# Altium PCB ePBR25_ACU_Latching_rev0.PcbDoc (part 1 of 3)
Units mil, origin at the board's own origin, x right, y up, seen from the top; angles counter-clockwise.
Board outline 2203 x 2390 mil, 2 copper layers (Top Layer, Bottom Layer); 131 components, 88 nets, 367 pads, 243 vias.
Unrouted connection lines stored in the file: 94.
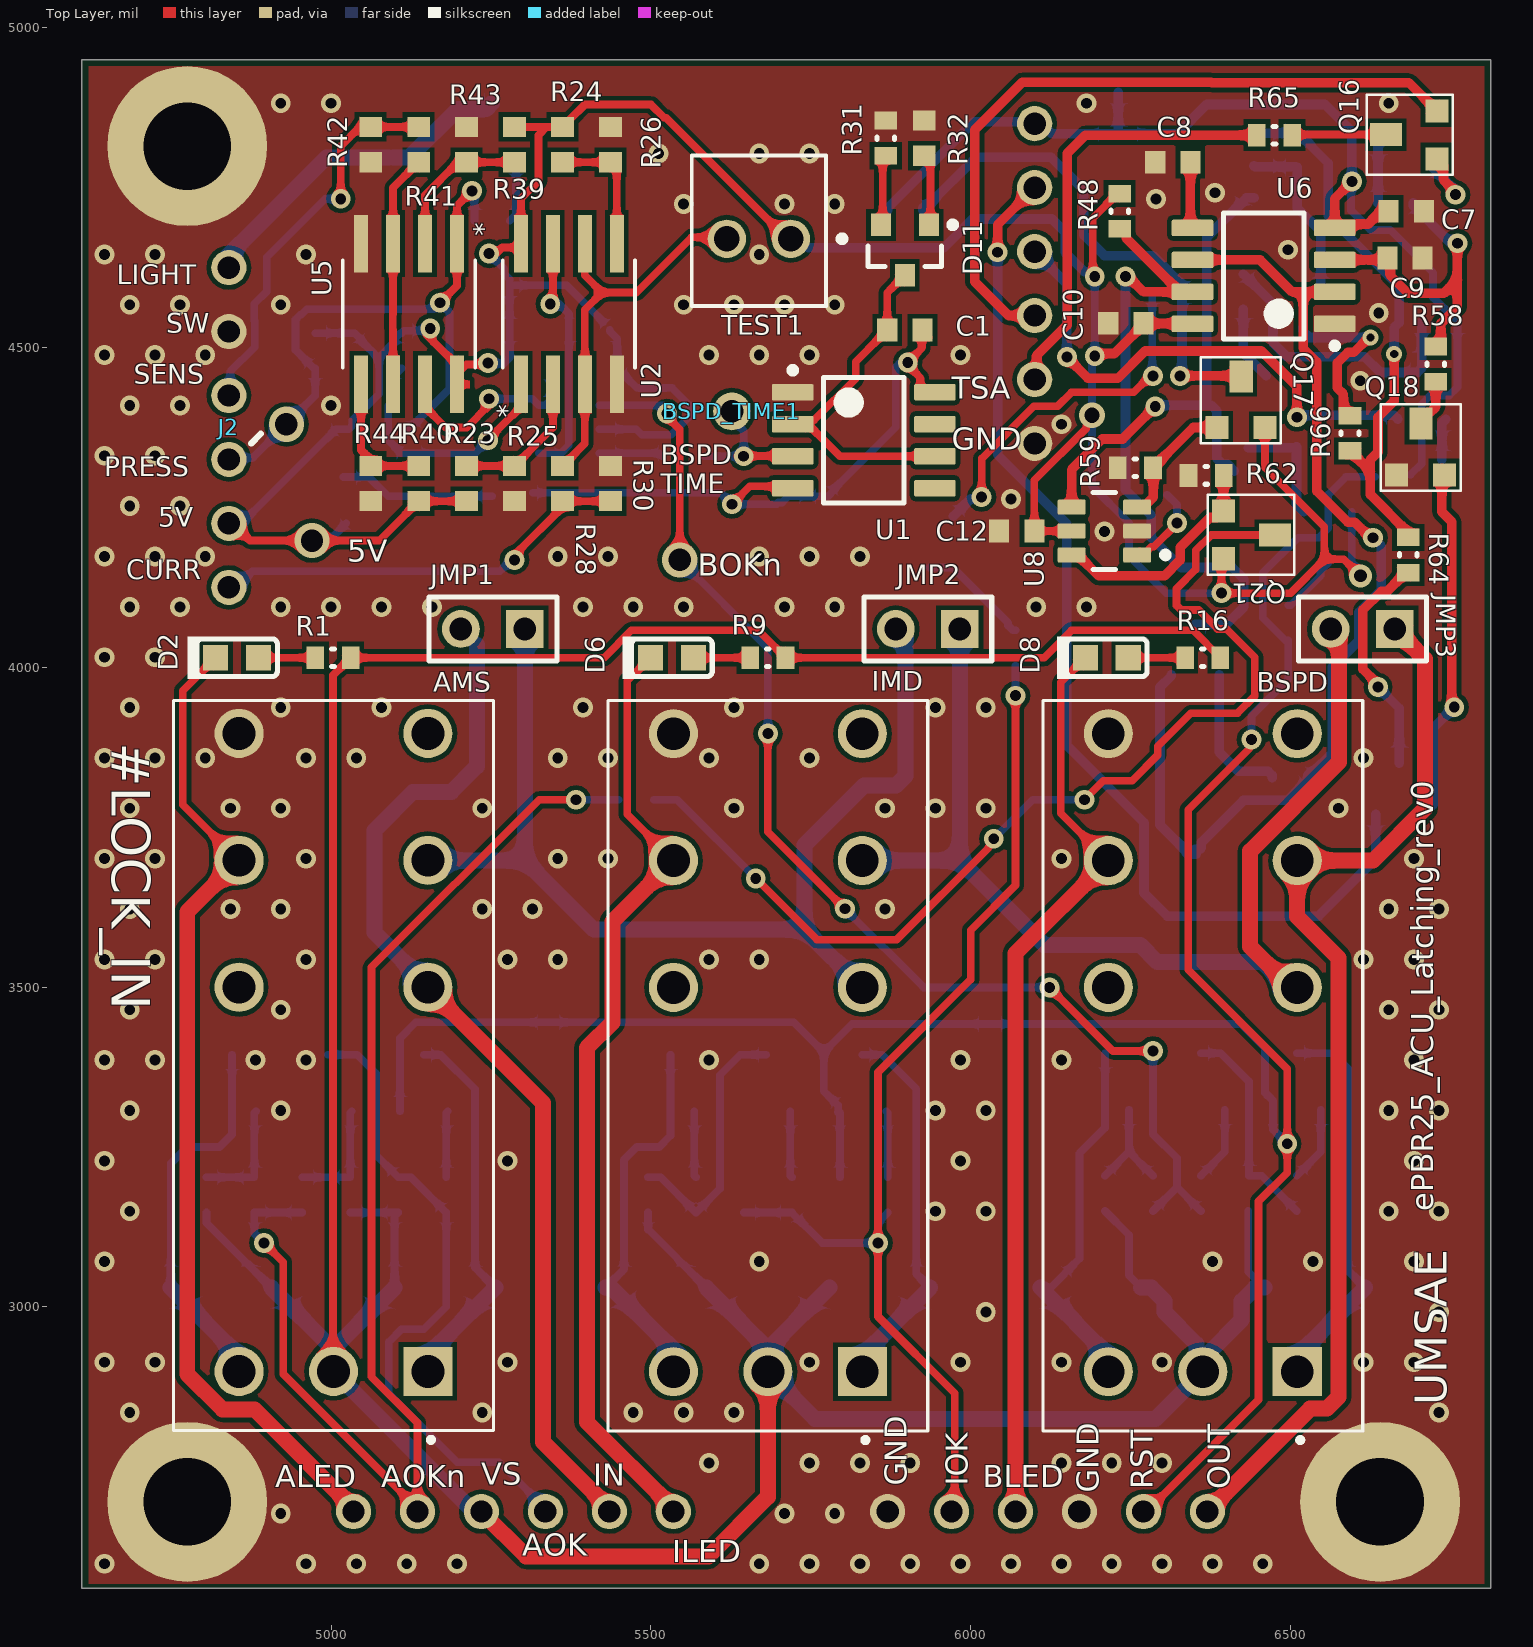
[diagram p0: Top Layer view]
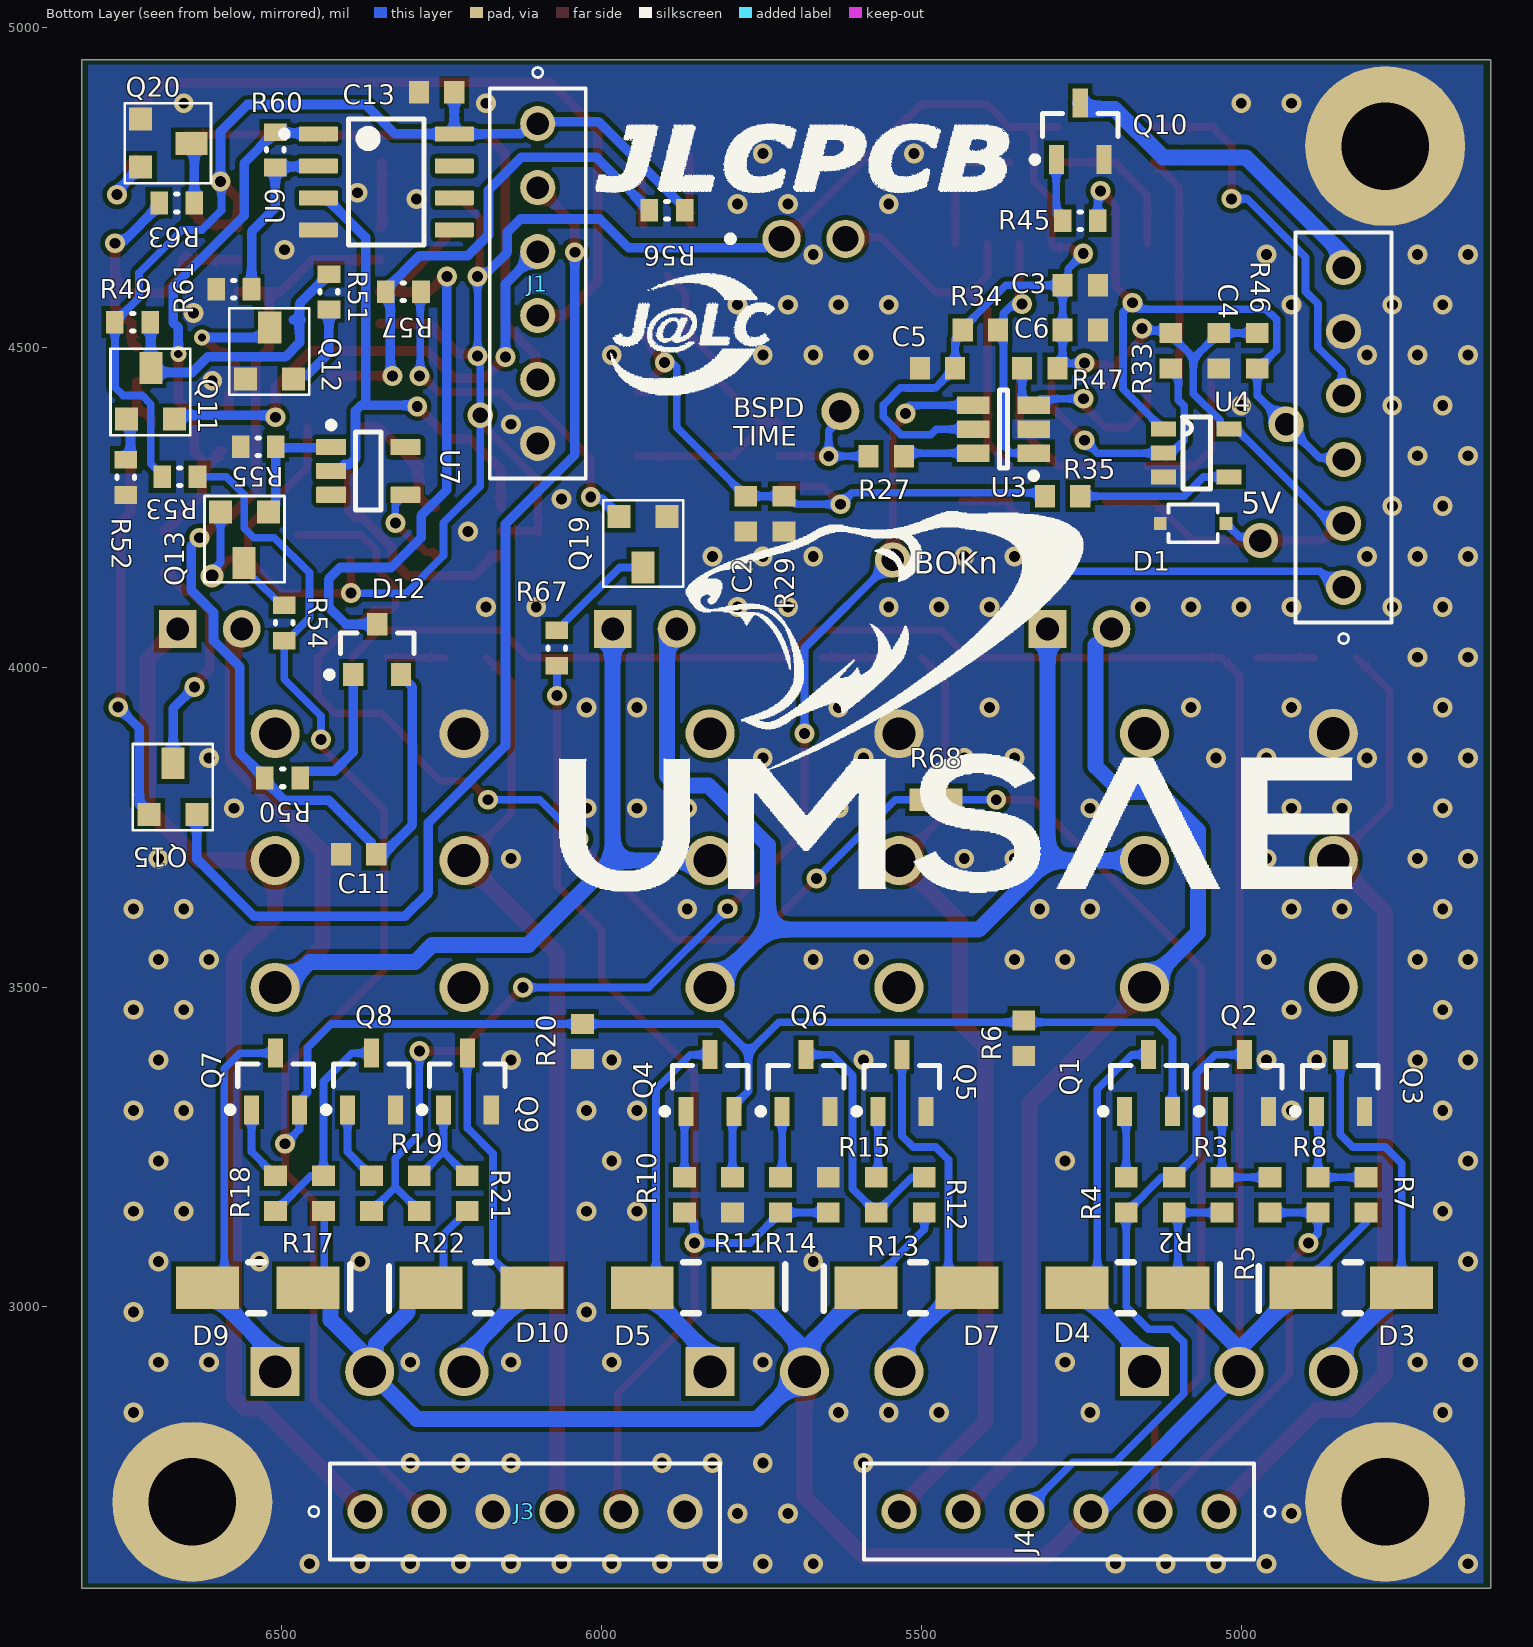
[diagram p1: Bottom Layer view, seen from below]

## Layer stack, top to bottom
Top Solder: solder mask 0.4, Solder Resist, Dk 3.5
Top Layer: signal copper 1.4
Dielectric 1: dielectric 12.6, FR-4, Dk 4.8
Bottom Layer: signal copper 1.4
Bottom Solder: solder mask 0.4, Solder Resist, Dk 3.5

## Board outline
6813,2560 6813,4950 4610,4950 4610,2560

## Design rules (kind name [scope] priority, off if disabled: settings)
Clearance [All] p1: gap=7 ignorepadtopadclearanceinfootprint=TRUE except(0: Arc-Hole Track-Hole SMDPad-Hole THPad-Hole Via-Hole Fill-Hole Poly-Hole Region-Hole Text-Hole)
HoleSize [All] p1: absolutevalues=TRUE maxlimit=200 minlimit=10 maxpercent=80.000 minpercent=20.000
HoleToHoleClearance [All] p1: gap=8 allowstackedmicrovias=TRUE
MinimumAnnularRing MinimumAnnularRing_Pad [IsPad] p1: minimumring=7
MinimumAnnularRing MinimumAnnularRing_Via [IsVia] p2: minimumring=5
MinimumSolderMaskSliver [All] p1: minsoldermaskwidth=4
PlaneClearance [All] p1: clearance=15
PlaneConnect PlaneConnect_12V [InNet('12V')] p1: planeconnectstyle=Direct reliefexpansion=20 reliefentries=4 reliefconductorwidth=20 reliefairgap=10
PlaneConnect PlaneConnect_1 [All] p2: planeconnectstyle=Relief reliefexpansion=15 reliefentries=4 reliefconductorwidth=15 reliefairgap=10
PolygonConnect [All] p1: connectstyle=Direct reliefconductorwidth=15 reliefentries=4 polygonreliefangle="90 Angle" airgapwidth=10
RoutingVias [All] p1: holewidth=17 width=31 viastyle="Through Hole" minholewidth=15 minwidth=29 maxholewidth=50 maxwidth=100
SilkToSilkClearance [All] p1: silktosilkclearance=0.1
SilkToSolderMaskClearance [IsPad] p1: minsilkscreentomaskgap=2 clearancetoexposedcopper=TRUE
SolderMaskExpansion [All] p1: expansion=3 istentingtop=FALSE
SupplyNets "Schematic Supply Nets_3" [InNet('LATCHING_Delayed')] p1: voltage=0.000
SupplyNets "Schematic Supply Nets_2" [InNet('GND')] p2: voltage=0.000
SupplyNets "Schematic Supply Nets_1" [InNet('ACU_PWR')] p3: voltage=0.000
SupplyNets "Schematic Supply Nets" [InNet('5V')] p4: voltage=0.000
Width [All] p1: maxlimit=200 minlimit=7 preferedwidth=15
23 further rules are at their usual default settings.

## Classes and differential pairs
component class "4  - Latching": D1 J1 J2 J3 J4 J? JMP1 JMP2 JMP3
component class Designator: D5 D6 D7 IMD Q4 Q5 Q6 R9 R10 R11 R12 R13 R14 R15

## Components (designator, comment, footprint, x,y, rotation, side; value= is the part's Value field where it differs from the comment)
AMS "RT424F12" TE_5-1393243-4 5003.64,3377.35 r90 top
BSPD "RT424F12" TE_5-1393243-4 6362.87,3377 r90 top
BSPD_TIME1 "Test Via" "Test Via" 5626.75,4400.12 r270 top
C1 "Cap Semi" 1608[0603] 5897.1,4527.4 r0 top value=10uF
C2 "100nF" 1608[0603] 5775,4240 r270 bottom value=0.1uF
C3 "100nF" 1608[0603] 5251.74,4597.32 r180 bottom value=0.1uF
C4 "100nF" 1608[0603] 5035,4495 r270 bottom value=0.1uF
C5 "100nF" 1608[0603] 5475,4467.44 r0 bottom value=0.1uF
C6 "100nF" 1608[0603] 5251.75,4527.32 r180 bottom value=0.1uF
C7 "100nF" 1608[0603] 6681,4713 r0 top value=0.1uF
C8 "Cap Semi" 1608[0603] 6316,4789.76 r0 top value=15uF
C9 "Cap Semi" 1608[0603] 6679,4640 r0 top value=15uF
C10 "100nF" 1608[0603] 6242.56,4538 r0 top value=0.1uF
C11 "Cap Semi" 1608[0603] 6380,3707.56 r0 bottom value=15uF
C12 "100nF" 1608[0603] 6072,4213.06 r180 top value=0.1uF
C13 "100nF" 1608[0603] 6258,4899 r180 bottom value=0.1uF
D1 "D Zener" DIODE_SOD323_101 5075.12,4225 r180 bottom
D2 "AMS_ERR" TOSH-0603LED_RED_V 4852.87,4015 r0 top
D3 "D Zener" DO214AC 5177.87,3030 r180 bottom
D4 "D Zener" DO214AC 4827.87,3030 r0 bottom
D5 "D Zener" DO214AC 5857.87,3030 r180 bottom
D6 "IMD_ERR" TOSH-0603LED_RED_V 5532.87,4015 r0 top
D7 "D Zener" DO214AC 5507.87,3030 r0 bottom
D8 "BSPD_ERR" TOSH-0603LED_RED_V 6212.87,4015 r0 top
D9 "D Zener" DO214AC 6537.87,3030 r180 bottom
D10 "D Zener" DO214AC 6187.87,3030 r0 bottom
D11 "SZNUP1301ML3T1G" ONSC-SOT-23-3-318-08_V 5897.1,4652.4 r270 top
D12 "SZNUP1301ML3T1G" ONSC-SOT-23-3-318-08_V 6351,4028 r90 bottom
IMD "RT424F12" TE_5-1393243-4 5682.87,3377 r90 top
J1 "5-535541-4" 5-535541-4_5-535541-4(Primary) 6100,4650 r270 bottom
J2 "5-535541-4" 5-535541-4_5-535541-4(PRIMARY) 4840,4325 r90 top
J3 "5-535541-4" 5-535541-4_5-535541-4(Primary) 6170,2680 r180 bottom
J4 "5-535541-4" 5-535541-4_5-535541-4(PRIMARY) 5235,2680 r0 bottom
JMP1 "Header 2" "2Pin Jumper" 5302.87,4060 r180 top
JMP2 "Header 2" "2Pin Jumper" 5982.87,4060 r180 top
JMP3 "Header 2" "2Pin Jumper" 6662.87,4060 r180 top
Q1 "" SOT-23_N 5145,3350 r90 bottom
Q2 "" SOT-23_N 4995,3350 r90 bottom
Q3 "" SOT-23_N 4845,3350 r90 bottom
Q4 "" SOT-23_N 5830.5,3350 r90 bottom
Q5 "" SOT-23_N 5530.5,3350 r90 bottom
Q6 "" SOT-23_N 5680.5,3350 r90 bottom
Q7 "" SOT-23_N 6510,3352.43 r90 bottom
Q8 "" SOT-23_N 6360,3352.43 r90 bottom
Q9 "" SOT-23_N 6210,3352.43 r90 bottom
Q10 "" SOT-23_N 5251.74,4838.2 r90 bottom
Q11 "" SOT23-GDS 6743,4388 r90 bottom
Q12 "" SOT23-GDS 6557,4451 r90 bottom
Q13 "" SOT23-GDS 6521,4243 r270 bottom
Q15 "" SOT23-GDS 6708,3770 r90 bottom
Q16 "" SOT23-GDS 6729,4795 r180 top
Q17 "" SOT23-GDS 6385,4375 r90 top
Q18 "" SOT23-GDS 6666,4301 r90 top
Q19 "" SOT23-GDS 5897.64,4236 r270 bottom
Q20 "" SOT23-GDS 6721,4857 r180 bottom
Q21 "" SOT23-GDS 6395.47,4244.75 r0 top
R1 "560" RESC0603(1608)_L 5002.87,4015 r0 top
R2 "RHM1.0KDCT-ND" 1608[0603] 5105,3175 r90 bottom
R3 "RHM1.0KDCT-ND" 1608[0603] 5030,3175 r90 bottom
R4 "Res1" 1608[0603] 5180,3175 r90 bottom value=1k
R5 "Res1" 1608[0603] 4955,3175 r90 bottom value=1k
R6 "Res1" 1608[0603] 5340,3420 r90 bottom value=10K
R7 "RHM1.0KDCT-ND" 1608[0603] 4805,3175 r90 bottom
R8 "1k" 1608[0603] 4880,3175 r90 bottom value=120
R9 "560" RESC0603(1608)_L 5682.87,4015 r0 top
R10 "Res1" 1608[0603] 5870.5,3175 r90 bottom value=1k
R11 "Res1" 1608[0603] 5795.5,3175 r90 bottom value=10k
R12 "RHM1.0KDCT-ND" 1608[0603] 5495.5,3175 r90 bottom
R13 "Res1" 1608[0603] 5570.5,3175 r270 bottom value=1k
R14 "Res1" 1608[0603] 5720.5,3175 r270 bottom value=1k
R15 "Res1" 1608[0603] 5645.5,3175 r90 bottom value=10k
R16 "560" RESC0603(1608)_L 6362.87,4015 r0 top
R17 "RHM1.0KDCT-ND" 1608[0603] 6435,3177.43 r90 bottom
R18 "Res1" 1608[0603] 6510,3177.43 r90 bottom value=1k
R19 "Res1" 1608[0603] 6360,3177.43 r90 bottom value=1k
R20 "Res1" 1608[0603] 6030,3415 r90 bottom value=10K
R21 "RHM1.0KDCT-ND" 1608[0603] 6210,3177.43 r90 bottom
R22 "Res1" 1608[0603] 6285,3177.43 r90 bottom value=1k
R23 "Volt. Div. R1" 1608[0603] 5211.75,4287.32 r270 top
R24 "Volt. Div. R1" 1608[0603] 5361.75,4817.32 r90 top
R25 "Volt. Div. R2" 1608[0603] 5286.75,4287.32 r90 top value=20K
R26 "Volt. Div. R2" 1608[0603] 5436.75,4817.32 r270 top value=10k
R27 "Volt. Div. R1" 1608[0603] 5555,4330 r0 bottom value=0
R28 "Volt. Div. R2" 1608[0603] 5361.75,4287.32 r270 top value=100
R29 "Res1" 1608[0603] 5715,4240 r90 bottom value=10K
R30 "Volt. Div. R2" 1608[0603] 5436.75,4287.32 r270 top value=10k
R31 "1000K" RESC0603(1608)_L 5867.1,4827.4 r270 top
R32 "Res1" 1608[0603] 5927.1,4827.4 r270 top value=10K
R33 "Volt. Div. R2" 1608[0603] 5110,4495 r90 bottom value=10k
R34 "Volt. Div. R2" 1608[0603] 5407.98,4527.32 r0 bottom value=10k
R35 "Volt. Div. R2" 1608[0603] 5279.3,4267.56 r180 bottom value=100
R39 "Volt. Div. R1" 1608[0603] 5286.75,4817.32 r90 top
R40 "Volt. Div. R1" 1608[0603] 5136.75,4287.32 r270 top
R41 "Volt. Div. R2" 1608[0603] 5136.75,4817.32 r90 top value=100
R42 "Volt. Div. R2" 1608[0603] 5061.75,4817.32 r90 top value=1000k
R43 "Volt. Div. R2" 1608[0603] 5211.75,4817.32 r270 top value=10k
R44 "Volt. Div. R2" 1608[0603] 5061.75,4287.32 r90 top value=10k
R45 "1k" RESC0603(1608)_L 5251.74,4698.2 r0 bottom
R46 "Volt. Div. R2" 1608[0603] 4975,4495 r90 bottom value=10k
R47 "Volt. Div. R2" 1608[0603] 5315,4467.44 r180 bottom value=10k
R48 "20k" RESC0603(1608)_L 6232.79,4713 r270 top value=1k
R49 "10k" RESC0603(1608)_L 6733.5,4539.72 r180 bottom value=1k
R50 "20K" RESC0603(1608)_L 6499,3827 r180 bottom value=1k
R51 "1k" RESC0603(1608)_L 6426.44,4587 r90 bottom
R52 "1k" RESC0603(1608)_L 6744,4297 r90 bottom
R53 "10K" RESC0603(1608)_L 6659.56,4298 r0 bottom value=1k
R54 "1K" RESC0603(1608)_L 6496.49,4069.36 r90 bottom value=1k
R55 "10k" RESC0603(1608)_L 6537,4345 r0 bottom value=1k
R56 "10K" RESC0603(1608)_L 5897.87,4714.53 r180 bottom value=1k
R57 "1K" RESC0603(1608)_L 6310,4587 r0 bottom value=1k
R58 "1K" RESC0603(1608)_L 6727,4474 r270 top value=1k
R59 "10k" RESC0603(1608)_L 6257.44,4312 r180 top value=1k
R60 "1.4k" RESC0603(1608)_L 6510.5,4809.11 r90 bottom value=1k
R61 "1k" RESC0603(1608)_L 6575,4591 r0 bottom
R62 "10k" RESC0603(1608)_L 6368,4300 r180 top value=1k
R63 "1K" RESC0603(1608)_L 6664.44,4726 r180 bottom value=1k
R64 "1K" RESC0603(1608)_L 6684.11,4175.65 r270 top value=1k
R65 "1K" RESC0603(1608)_L 6475,4832 r0 top value=1k
R66 "1K" RESC0603(1608)_L 6593,4366 r90 top value=1k
R67 "1K" RESC0603(1608)_L 6070,4030.13 r90 bottom value=1k
R68 "1K" RESC0603(1608)_L 5477,3793 r0 bottom value=1k
TEST1 "Header 2" "2 Pin Connector" 5618.8,4670 r0 top
U1 "NE555DR" D0008A_M 5832.87,4355 r0 top
U2 "LM293DR" LM293DR 5371.75,4552.32 r90 top
U3 "OR Gate" SOT23-6_M 5371.75,4372.32 r0 bottom
U4 "SN74LVC1G08DBVR" SSOP5-P-0.95 5121.74,4372.32 r180 bottom
U5 "LM293DR" LM293DR 5121.75,4552.32 r270 top
U6 "NE555DR" D0008A_M 6458,4612 r180 top
U7 "SN74LVC1G08DBVR" DBV0005A_M 6365,4307 r180 bottom
U8 "SN74LVC1G332DBVR" FP-DBV0006A-MFG 6208.89,4213.06 r180 top
U9 "LM358DR" FP-D0008A-MFG 6336.7,4759 r180 bottom

## Footprints (in the part's own frame and the unit in brackets; to place one, negate y for a bottom-side part, rotate by r counter-clockwise, add the part's x,y. Pads: shape width x height; smd on the part's side, far side on the other; paste and mask are expansions set on the pad)
"2 Pin Connector" [mil] "640456-2 TE Connectivity"
  round 60 hole 40 mask-1000: 1(100,0) 2(0,0)
  silkscreen extent -55,-105 185,130, body extent -51,-107 149,123, height 400
"2Pin Jumper" [mm] "2 Pin quick jumper"
  rect 1.5x1.5 hole 0.9: 1(0,0)
  round 1.5 hole 0.9: 2(2.54,0)
  silkscreen extent -1.27,-1.27 3.81,1.27, body extent -1.27,-1.27 3.81,1.27, height 9.5
5-535541-4_5-535541-4(Primary) [mil]
  round 55 hole 35 mask-1000: A1(-200,0) A2(-100,0) A3(0,0) A4(100,0) A5(200,0) A6(300,0)
  silkscreen extent -288,-75 355,75, body extent -251,-70 349,70, height 245
5-535541-4_5-535541-4(PRIMARY) [mil]
  round 55 hole 35 mask-1000: A1(-200,0) A2(-100,0) A3(0,0) A4(100,0) A5(200,0) A6(300,0)
  body extent -251,-70 349,70, height 245
1608[0603] [mm] "Chip Capacitor, Body 1.6x0.8mm, IPC High Density"
  rect 0.8x0.9 smd: 1(-0.7,0) 2(0.7,0)
  body extent -0.87,-0.48 0.87,0.48, height 1.3
D0008A_M [mm] "SOIC, 8-Leads, Body 5x4mm, Pitch 1.27mm, IPC Low Density"
  rrect15% 1.65x0.65 smd: 1(-2.825,1.905) 2(-2.825,0.635) 3(-2.825,-0.635) 4(-2.825,-1.905) 5(2.825,-1.905) 6(2.825,-0.635) 7(2.825,0.635) 8(2.825,1.905)
  silkscreen extent -2.95,-2.5 1.6,2.9, body extent -3,-2.45 3,2.45, height 1.63
DBV0005A_M [mm] "SOT23, 5-Leads, Body 3.05x1.75mm, Pitch 0.95mm, IPC Low Density"
  rrect15% 1.2x0.65 smd: 1(-1.475,0.95) 2(-1.475,0) 3(-1.475,-0.95) 4(1.475,-0.95) 5(1.475,0.95)
  silkscreen extent -1.6,-1.55 0.5,1.95, body extent -1.42,-1.46 1.42,1.46, height 1.08
DIODE_SOD323_101 [mil]
  rect 20x20 smd: 1(-51.5,0) 2(51.5,0)
  silkscreen extent -39,-30 39,30, body extent -53,-24 53,24, height 39
DO214AC [mm]
  rect 2.5x1.7 smd: 1(-2,0) 2(2,0)
  silkscreen extent -0.38,-1.02 3.67,1.02, body extent -2.42,-1.1 2.4,1.1, height 2.5
FP-D0008A-MFG [mm]
  rrect17% 1.55x0.6 smd paste+0 mask+0: 1(-2.7,1.905) 2(-2.7,0.635) 3(-2.7,-0.635) 4(-2.7,-1.905) 5(2.7,-1.905) 6(2.7,-0.635) 7(2.7,0.635) 8(2.7,1.905)
  silkscreen extent -4.18,-2.5 1.5,2.5, body extent -3,-2.45 3,2.45, height 1.75
FP-DBV0006A-MFG [mm]
  rrect17% 1.1x0.6 smd paste+0 mask+0: 1(-1.3,0.95) 2(-1.3,0) 3(-1.3,-0.95) 4(1.3,-0.95) 5(1.3,0) 6(1.3,0.95)
  silkscreen extent -2.55,-1.53 0.45,1.53, body extent -1.95,-1.78 1.95,1.78, height 0.25
LM293DR [mil] "IC Dual Comparator 8SOIC"
  rect 90x22 smd: 1(-110,75) 2(-110,25) 3(-110,-25) 4(-110,-75) 5(110,-75) 6(110,-25) 7(110,25) 8(110,75)
  silkscreen extent -84,-104 84,104, body extent -122,-98 122,99, height 69
ONSC-SOT-23-3-318-08_V [mm] "SOT23, 3-Leads, Body 2.92x1.3mm, Pitch 0.95mm"
  rect 0.9x0.8 smd: 1(-1,0.95) 2(-1,-0.95) 3(1,0)
  silkscreen extent -1.12,-1.46 0.65,2.03, body extent -0.65,-1.46 0.65,1.46, height 1.11
RESC0603(1608)_L [mm]
  rect 0.7x0.9 smd: 1(-0.7,0) 2(0.7,0)
  silkscreen extent -0.05,-0.35 0.05,0.35, body extent -0.85,-0.47 0.85,0.47, height 0.6
SOT23-6_M [mm] "SOT23, 6-Leads, Body 2.9x1.6mm, Pitch 0.95mm, Lead Span 2.7mm, IPC Low Density"
  rect 1.3x0.7 smd: 1(-1.2,0.95) 2(-1.2,0) 3(-1.2,-0.95) 4(1.2,-0.95) 5(1.2,0) 6(1.2,0.95)
  silkscreen extent -1.32,-1.55 0.15,1.97, body extent -0.9,-1.55 0.9,1.55, height 1.45
SOT23-GDS [mil]
  rect 50x36 smd: 1(80,-38)
  rect 36x36 smd: 2(0,0) 3(0,-75)
  silkscreen extent -25,-100 110,25, body extent -3,-95 94,20, height 41
SOT-23_N [mm] "SOT23, 3-Leads, Body 2.9x1.3mm, Pitch 0.95mm, Lead Span 2.5mm, IPC Medium Density"
  rect 1.15x0.6 smd: 1(-1.125,0.95) 2(-1.125,-0.95) 3(1.125,0)
  silkscreen extent -1.25,-1.5 0.7,1.93, body extent -0.7,-1.5 0.7,1.5, height 1.1
SSOP5-P-0.95 [mm]
  rect 1x0.6 smd: 1(0,0) 2(0,-0.95) 3(0,-1.9) 4(2.6,-1.9) 5(2.6,0)
  silkscreen extent 0.76,-2.38 1.88,0.48, body extent 0.5,-2.43 2.1,0.48, height 1.1
TE_5-1393243-4 [mm]
  round 1.95 hole 1.3: 11(8.15,-3.75) 12(3.11,-3.75) 14(13.19,-3.75) 21(8.15,3.75) 22(3.11,3.75) 24(13.19,3.75) A2(-12.15,3.75) A3(-12.15,0)
  rect 1.95x1.95 hole 1.3: A1(-12.15,-3.75)
  silkscreen extent -14.96,-6.35 14.5,6.35
"Test Via" [mm] "Test Via Hole"
  round 1.5 hole 0.9: 1(0,0)
TOSH-0603LED_RED_V [mm] "SMT LED, 2-Leads, Body 1.6x0.8mm (0603-Size)"
  rect 1x1 smd paste+0 mask+0: 1(0.85,0) 2(-0.85,0)
  silkscreen extent -1.97,-0.85 1.6,0.85, body extent -0.92,-0.53 1.09,0.53, height 0.6

## Part data
AMS BSPD IMD: "General Purpose Relay DPDT (2 Form C) 12VDC Coil Through Hole", Package=None, Availability=Unavailable, DigiKey-Purchase-URL=https://snapeda.com/shop?store=DigiKey&id=3226354, MF="TE Connectivity", MP=RT424F12, Price=None, SnapEDA_Link=https://www.snapeda.com/parts/RT424F12/TE%20Connectivity%20Potter%20&%20Brumfield%20Relays/view-part/3226354/?ref=snap
BSPD_TIME1: library part "Test VIa"
C1: "Capacitor (Semiconductor SIM Model)", Supplier Part Number 1=490-10991-1-ND, LatestRevisionDate=29-May-2009, LatestRevisionNote="IPC-7351 Footprint Added.", PackageDescription="Chip Capacitor", PackageReference=C1206, Published=8-Jun-2000, Publisher="Altium Limited", Supplier 1=Digi-Key
C2 C4 C5 C6 C7 C10 C12 C13: library part 0805C-100nF-25V-X7R-MUR, "CAP CER 0.1UF 50V X7R 0603", Capacitance=0.1µF, Manufacturer=Kemet, Manufacturer Part Number=C0603C104K5RACAUTO, Operating Temperature="-55°C ~ 125°C", Package / Case="0603 (1608 Metric)", Ratings=AEC-Q200, Supplier Part Number 1=399-6856-1-ND, Temperature Coefficient=X7R, Tolerance=±10%, Voltage - Rated=50V, Applications=Automotive, Category=Capacitors, ComponentLink1Description=http://capacitoredge.kemet.com/capedge2/DataSheet?pn=C0603C104K5RACAUTO, ComponentLink1URL=http://capacitoredge.kemet.com/capedge2/DataSheet?pn=C0603C104K5RACAUTO, Features=-, Height - Seated (Max)=-, Lead Spacing=-, Lead Style=-, Mounting Type="Surface Mount, MLCC", Packaging="Cut Tape (CT)", Pricing 1="1=0.14, 10=0.095, 25=0.0672, 50=0.0514, 100=0.0435, 250=0.03556, 1000=0.02324 (CAD)", RoHS="RoHS Compliant", Size / Dimension="0.063\" L x 0.031\" W (1.60mm x 0.80mm)", Stock 1=157876, Supplier 1=Digi-Key, Thickness (Max)="0.034\" (0.87mm)"
C3: library part 0805C-100nF-25V-X7R-MUR, "CAP CER 0.1UF 50V X7R 0603", Capacitance=0.1µF, Manufacturer=Kemet, Manufacturer Part Number=C0603C104K5RACAUTO, Operating Temperature="-55°C ~ 125°C", Package / Case="0603 (1608 Metric)", Ratings=AEC-Q200, Temperature Coefficient=X7R, Tolerance=±10%, Voltage - Rated=50V, Applications=Automotive, Category=Capacitors, ComponentLink1Description=http://capacitoredge.kemet.com/capedge2/DataSheet?pn=C0603C104K5RACAUTO, ComponentLink1URL=http://capacitoredge.kemet.com/capedge2/DataSheet?pn=C0603C104K5RACAUTO, Features=-, Height - Seated (Max)=-, Lead Spacing=-, Lead Style=-, Mounting Type="Surface Mount, MLCC", Packaging="Cut Tape (CT)", Pricing 1="1=0.14, 10=0.095, 25=0.0672, 50=0.0514, 100=0.0435, 250=0.03556, 1000=0.02324 (CAD)", RoHS="RoHS Compliant", Size / Dimension="0.063\" L x 0.031\" W (1.60mm x 0.80mm)", Stock 1=157876, Supplier 1=Digi-Key, Thickness (Max)="0.034\" (0.87mm)"
C8 C9 C11: "Capacitor (Semiconductor SIM Model)", LatestRevisionDate=29-May-2009, LatestRevisionNote="IPC-7351 Footprint Added.", PackageDescription="Chip Capacitor", PackageReference=C1206, Published=8-Jun-2000, Publisher="Altium Limited"
D1: "Zener Diode", Supplier Part Number 1=DDZ5V6ASF-7DICT-ND, LatestRevisionDate=17-Jul-2002, LatestRevisionNote="Re-released for DXP Platform.", PackageDescription="Diode, Thru-Hole; 2 Leads; 0.7 in Pin Spacing", PackageReference=DIODE-0.7, Published=8-Jun-2000, Publisher="Altium Limited", Supplier 1=Digi-Key
D2 D6 D8: library part CMP-0444-00001-1, "LED, Red 0603 (1608) 63mCd", Forward Current="25 mA", Manufacturer=Toshiba, PartNumber=TLSU1008A(T04), Power Dissipation="60 mW", Reverse Voltage="4 V", Storage Temperature="-40 to 100 degC", Supplier Part Number 1=475-2512-1-ND, ComponentLink1Description="Manufacturer URL", ComponentLink1URL=http://www.toshiba-components.com/, ComponentLink2Description=Datasheet, ComponentLink2URL=http://www.semicon.toshiba.co.jp/info/docget.jsp?type=datasheet&lang=en&pid=TLSU1008A(T04), DatasheetVersion=Aug-08, Mounting Technology="Surface Mount", PackageDescription="2-Pin SMT LED, 1.6 x 0.8 mm Pitch", PackageReference=0603LED_RED, Packing Type=Reel, Supplier 1=Digi-Key
D3 D4 D5 D7 D9 D10: "Zener Diode", Supplier Part Number 1=641-1015-1-ND, LatestRevisionDate=17-Jul-2002, LatestRevisionNote="Re-released for DXP Platform.", PackageDescription="Diode, Thru-Hole; 2 Leads; 0.7 in Pin Spacing", PackageReference=DIODE-0.7, Published=8-Jun-2000, Publisher="Altium Limited", Supplier 1=Digi-Key
D11 D12: library part CMP-1063-00171-1, "Low Capacitance Diode Array for ESD Protection in a Single Data Line, 3-Pin SOT-23, Pb-Free, Tape and Reel", Manufacturer="On Semiconductor", Supplier Part Number 1=SZNUP1301ML3T1GOSCT-ND, C Max (pF)=0.9, ComponentLink1Description="Manufacturer URL", ComponentLink1URL=http://www.onsemi.com/, ComponentLink2Description=Datasheet, ComponentLink2URL=http://www.onsemi.cn/pub_link/Collateral/NUP1301ML3T1-D.PDF, ComponentLink3Description="Package Specification", ComponentLink3URL=http://www.onsemi.cn/pub_link/Collateral/318-08.PDF, DatasheetVersion="Rev. 6", Direction=Bidirectional, Mounting Technology="Surface Mount", Number of Lines=1, PackageDescription="3-Pin Small Outline Transistor, Body 2.92 x 1.3 mm, Pitch 0.95 mm", PackageReference=SOT-23-3-318-08, PackageVersion="Rev. AP, 11/2009", Packing="Tape and Reel", PartNumber=SZNUP1301ML3T1G, RoHS=Pb-Free, Supplier 1=Digi-Key, V(BR) Min (V)=70, VRWM Max (V)=70
J1 J2 J3 J4: Supplier Part Number 1=A32920-ND, Built_By=EMA_UL_Team, C="Copyright (C) 2015 Accelerated Designs. All rights reserved", Manufacturer_Part_Number=5-535541-4, Supplier 1=Digi-Key, Vendor="TE Connectivity"
JMP1 JMP2 JMP3: "Header, 2-Pin", Current Rating="3A per Contact", Insulation Color=Black, Manufacturer="Harwin Inc.", Manufacturer Part Number=M20-9990246, Material Flammability Rating="UL94 V-0", Operating Temperature="-40°C ~ 105°C", Supplier Part Number 1=S1012E-02-ND, Voltage Rating=-, Applications=-, Category="Connectors, Interconnects", ComponentLink1Description=https://cdn.harwin.com/pdfs/M20-999.pdf, ComponentLink1URL=https://cdn.harwin.com/pdfs/M20-999.pdf, Connector Type="Header, Cuttable", Contact Finish - Mating=Tin, Contact Finish - Post=Tin, Contact Finish Thickness - Mating=-, Contact Finish Thickness - Post=-, Contact Length - Mating="0.240\" (6.10mm)", Contact Length - Post="0.118\" (3.00mm)", Contact Material=Brass, Contact Shape=Square, Contact Type="Male Pin", Fastening Type=Push-Pull, Features=-, Ingress Protection=-, Insulation Height="0.100\" (2.54mm)", Insulation Material="Polyamide (PA6T), Nylon 6T", LatestRevisionDate=17-Jul-2002, LatestRevisionNote="Re-released for DXP Platform.", Mated Stacking Heights="10.04mm, 10.64mm, 11.04mm, 16.54mm", Mounting Type="Through Hole", Number of Positions=2, Number of Positions Loaded=All, Number of Rows=1, Overall Contact Length="0.460\" (11.68mm)", Packaging=Bulk, Part Status=Active, Pitch - Mating="0.100\" (2.54mm)", Publisher="Altium Limited", RoHS="RoHS Compliant", Row Spacing - Mating=-, Shrouding=Unshrouded, Style="Board to Board or Cable", Supplier 1=Digi-Key, Termination=Solder
Q1 Q2 Q3 Q4 Q5 Q6 Q7 Q8 Q9 Q10 Q11 Q12 Q13 Q15 Q16 Q17 Q18 Q19 Q20 Q21: library part MOSFET-N, "N-Channel MOSFET", Current - Continuous Drain (Id) @ 25°C="50A (Tc)", Drain to Source Voltage (Vdss)=30V, Input Capacitance (Ciss) @ Vds="1900pF @ 15V", Manufacturer="Infineon Technologies", Package / Case="TO-252-3, DPak (2 Leads + Tab), SC-63", Power - Max=47W, Supplier Device Package=PG-TO252-3, Supplier Part Number 1=DMG3406L-13DICT-ND, Category="Discrete Semiconductor Products", ComponentLink1Description=http://www.infineon.com/dgdl/Infineon-IPD075N03LG-DS-v02_01-en.pdf?folderId=5546d4694909da4801490a07012f053b&fileId=db3a30431936bc4b011951d824f83aeb, ComponentLink1URL=http://www.infineon.com/dgdl/Infineon-IPD075N03LG-DS-v02_01-en.pdf?folderId=5546d4694909da4801490a07012f053b&fileId=db3a30431936bc4b011951d824f83aeb, ComponentLink2Description=http://www.semicon.toshiba.co.jp/info/docget.jsp?type=datasheet&lang=en&pid=SSM3K329R, ComponentLink2URL=http://www.semicon.toshiba.co.jp/info/docget.jsp?type=datasheet&lang=en&pid=SSM3K329R, FET Feature="Logic Level Gate", FET Type="MOSFET N-Channel, Metal Oxide", Gate Charge (Qg) @ Vgs="18nC @ 10V", LatestRevisionDate=17-Jul-2002, LatestRevisionNote="Re-released for DXP Platform.", Mounting Type="Surface Mount", PackageDescription="TO, Flat Index; 3 In-Line, Axial Leads; Body Dia. 4.6mm; Lead Dia. 0.5 mm (max)", PackageReference=E3, PackageVersion=1995/1996, Packaging="Cut Tape (CT)", Published=8-Jun-2000, Publisher="Altium Limited", Rds On (Max) @ Id, Vgs="7.5 mOhm @ 30A, 10V", RoHS="RoHS Compliant", Supplier 1=Digi-Key, Vgs(th) (Max) @ Id="2.2V @ 250µA"
R1 R9 R16: library part CMP-1591-00001-1, "0603 (1608 Metric) Chip Resistor", Case-EIA=0603, Case-Metric=1608, Supplier Part Number 1=A129685CT-ND, PackageReference=RESC0603(1608), Supplier 1=Digi-Key
R2 R3 R7 R12 R17 R21: library part Res1, "RES SMD 1.0K OHM 5% 1/4W 0603", Manufacturer="Rohm Semiconductor", Manufacturer Part Number=ESR03EZPJ102, Operating Temperature="-55°C ~ 155°C", Package / Case="0603 (1608 Metric)", Power (Watts)="0.25W, 1/4W", Resistance (Ohms)=10k, Supplier Device Package=0603, Supplier Part Number 1=311-10KGRCT-ND, Temperature Coefficient=±200ppm/°C, Tolerance=±5%, Category=Resistors, ComponentLink1Description=http://rohmfs.rohm.com/en/products/databook/datasheet/passive/resistor/chip_resistor/esr.pdf, ComponentLink1URL=http://rohmfs.rohm.com/en/products/databook/datasheet/passive/resistor/chip_resistor/esr.pdf, Composition="Thick Film", Failure Rate=-, Features="Automotive AEC-Q200, Pulse Withstanding", Height - Seated (Max)="0.022\" (0.55mm)", Packaging="Cut Tape (CT)", Part Status=Active, Pricing 1="1=0.15, 10=0.119, 25=0.0824, 50=0.0642, 100=0.0458, 250=0.03568, 500=0.02836, 1000=0.02012 (CAD)", RoHS="RoHS Compliant", Size / Dimension="0.063\" L x 0.031\" W (1.60mm x 0.80mm)", Stock 1=220, Supplier 1=Digi-Key
R4 R5 R10 R13 R14 R18 R19 R22: "RES SMD 100 OHM 5% 1/4W 0603", Manufacturer="Rohm Semiconductor", Manufacturer Part Number=ESR03EZPJ101, Operating Temperature="-55°C ~ 155°C", Package / Case="0603 (1608 Metric)", Power (Watts)="0.25W, 1/4W", Resistance (Ohms)=100, Supplier Device Package=0603, Supplier Part Number 1=311-1.0KGRCT-ND, Temperature Coefficient=±200ppm/°C, Tolerance=±5%, Category=Resistors, ComponentLink1Description=http://rohmfs.rohm.com/en/products/databook/datasheet/passive/resistor/chip_resistor/esr.pdf, ComponentLink1URL=http://rohmfs.rohm.com/en/products/databook/datasheet/passive/resistor/chip_resistor/esr.pdf, Composition="Thick Film", Failure Rate=-, Features="Automotive AEC-Q200, Pulse Withstanding", Height - Seated (Max)="0.022\" (0.55mm)", LatestRevisionDate=17-Jul-2002, LatestRevisionNote="Re-released for DXP Platform.", PackageDescription="Axial Device, Thru-Hole; 2 Leads; 0.3 in Pin Spacing", PackageReference=AXIAL-0.3, Packaging="Cut Tape (CT)", Part Status=Active, Pricing 1="1=0.15, 10=0.119, 25=0.0824, 50=0.0642, 100=0.0458, 250=0.03568, 500=0.02836, 1000=0.02012 (CAD)", Published=8-Jun-2000, Publisher="Altium Limited", RoHS="RoHS Compliant", Size / Dimension="0.063\" L x 0.031\" W (1.60mm x 0.80mm)", Stock 1=57430, Supplier 1=Digi-Key
R6 R11 R20: "RES SMD 10K OHM 5% 1/4W 0603", Manufacturer="Rohm Semiconductor", Manufacturer Part Number=ESR03EZPJ103, Operating Temperature="-55°C ~ 155°C", Package / Case="0603 (1608 Metric)", Power (Watts)="0.25W, 1/4W", Resistance (Ohms)=10k, Supplier Part Number 1=311-10KGRCT-ND, Temperature Coefficient=±200ppm/°C, Tolerance=±5%, Category=Resistors, ComponentLink1Description=http://rohmfs.rohm.com/en/products/databook/datasheet/passive/resistor/chip_resistor/esr.pdf, ComponentLink1URL=http://rohmfs.rohm.com/en/products/databook/datasheet/passive/resistor/chip_resistor/esr.pdf, Composition="Thick Film", Failure Rate=-, Features="Automotive AEC-Q200, Pulse Withstanding", Height="0.022\" (0.55mm)", Height - Seated (Max)="0.022\" (0.55mm)", LatestRevisionDate=17-Jul-2002, LatestRevisionNote="Re-released for DXP Platform.", Number of Terminations=2, PackageDescription="Axial Device, Thru-Hole; 2 Leads; 0.3 in Pin Spacing", PackageReference=AXIAL-0.3, Packaging="Cut Tape (CT)", Part Status=Active, Pricing 1="1=0.15, 10=0.119, 25=0.0824, 50=0.0642, 100=0.0458, 250=0.03568, 500=0.02836, 1000=0.02012 (CAD)", Published=8-Jun-2000, Publisher="Altium Limited", RoHS="RoHS Compliant", Size / Dimension="0.063\" L x 0.031\" W (1.60mm x 0.80mm)", Stock 1=0, Supplier 1=Digi-Key, Supplier Device Package="0603 (1608 Metric)"
R8: library part Res1, "Resistor", Manufacturer="Panasonic Electronic Components", Manufacturer Part Number=ERJ-3EKF60R4V, Operating Temperature="-55°C ~ 155°C", Package / Case="0603 (1608 Metric)", Power (Watts)="0.1W, 1/10W", Resistance (Ohms)=60.4, Supplier Device Package=0603, Supplier Part Number 1=311-1.0KGRCT-ND, Temperature Coefficient=±100ppm/°C, Tolerance=±1%, Category=Resistors, ComponentLink1Description=http://industrial.panasonic.com/www-cgi/jvcr13pz.cgi?E+PZ+3+AOA0002+ERJ3EKF60R4V+7+WW, ComponentLink1URL=http://industrial.panasonic.com/www-cgi/jvcr13pz.cgi?E+PZ+3+AOA0002+ERJ3EKF60R4V+7+WW, Composition="Thick Film", Features="Automotive AEC-Q200", Height="0.022\" (0.55mm)", LatestRevisionDate=17-Jul-2002, LatestRevisionNote="Re-released for DXP Platform.", Number of Terminations=2, PackageDescription="Axial Device, Thru-Hole; 2 Leads; 0.3 in Pin Spacing", PackageReference=AXIAL-0.3, Packaging="Cut Tape (CT)", Pricing 1="1=0.15, 50=0.0176, 100=0.0129, 250=0.00992, 500=0.0079, 1000=0.00583 (CAD)", Published=8-Jun-2000, Publisher="Altium Limited", RoHS="RoHS Compliant", Size / Dimension="0.063\" L x 0.031\" W (1.60mm x 0.80mm)", Stock 1=113077, Supplier 1=Digi-Key
R15: "RES SMD 2.2K OHM 5% 1/4W 0603", Manufacturer="Rohm Semiconductor", Manufacturer Part Number=ESR03EZPJ222, Operating Temperature="-55°C ~ 155°C", Package / Case="0603 (1608 Metric)", Power (Watts)="0.25W, 1/4W", Resistance (Ohms)=2.2k, Supplier Part Number 1=311-10KGRCT-ND, Temperature Coefficient=±200ppm/°C, Tolerance=±5%, Category=Resistors, ComponentLink1Description=http://rohmfs.rohm.com/en/products/databook/datasheet/passive/resistor/chip_resistor/esr.pdf, ComponentLink1URL=http://rohmfs.rohm.com/en/products/databook/datasheet/passive/resistor/chip_resistor/esr.pdf, Composition="Thick Film", Features="Automotive AEC-Q200, Pulse Withstanding", Height="0.022\" (0.55mm)", LatestRevisionDate=17-Jul-2002, LatestRevisionNote="Re-released for DXP Platform.", Number of Terminations=2, PackageDescription="Axial Device, Thru-Hole; 2 Leads; 0.3 in Pin Spacing", PackageReference=AXIAL-0.3, Packaging="Cut Tape (CT)", Pricing 1="1=0.15, 10=0.121, 25=0.0832, 100=0.0463, 250=0.03604, 500=0.02866, 1000=0.02033 (CAD)", Published=8-Jun-2000, Publisher="Altium Limited", RoHS="RoHS Compliant", Size / Dimension="0.063\" L x 0.031\" W (1.60mm x 0.80mm)", Stock 1=17564, Supplier 1=Digi-Key, Supplier Device Package="0603 (1608 Metric)"
R23: library part Res1, "RES SMD 6.8K OHM 5% 1/4W 0603", Manufacturer="Rohm Semiconductor", Manufacturer Part Number=ESR03EZPJ682, Operating Temperature="-55°C ~ 155°C", Package / Case="0603 (1608 Metric)", Power (Watts)="0.25W, 1/4W", Resistance (Ohms)=6.8k, Supplier Device Package=0603, Supplier Part Number 1=311-6.8KGRCT-ND, Temperature Coefficient=±200ppm/°C, Tolerance=±5%, Category=Resistors, ComponentLink1Description=http://rohmfs.rohm.com/en/products/databook/datasheet/passive/resistor/chip_resistor/esr.pdf, ComponentLink1URL=http://rohmfs.rohm.com/en/products/databook/datasheet/passive/resistor/chip_resistor/esr.pdf, Composition="Thick Film", Failure Rate=-, Features="Automotive AEC-Q200, Pulse Withstanding", Height - Seated (Max)="0.022\" (0.55mm)", Packaging="Cut Tape (CT)", Part Status=Active, Pricing 1="1=0.15, 10=0.119, 25=0.0824, 50=0.0642, 100=0.0458, 250=0.03568, 500=0.02836, 1000=0.02012 (CAD)", RoHS="RoHS Compliant", Size / Dimension="0.063\" L x 0.031\" W (1.60mm x 0.80mm)", Stock 1=2440, Supplier 1=Digi-Key
R24 R40: library part Res1, "RES SMD 6.8K OHM 5% 1/4W 0603", Manufacturer="Rohm Semiconductor", Manufacturer Part Number=ESR03EZPJ682, Operating Temperature="-55°C ~ 155°C", Package / Case="0603 (1608 Metric)", Power (Watts)="0.25W, 1/4W", Resistance (Ohms)=100k, Supplier Device Package=0603, Supplier Part Number 1=311-100KHRCT-ND, Temperature Coefficient=±200ppm/°C, Tolerance=±5%, Category=Resistors, ComponentLink1Description=http://rohmfs.rohm.com/en/products/databook/datasheet/passive/resistor/chip_resistor/esr.pdf, ComponentLink1URL=http://rohmfs.rohm.com/en/products/databook/datasheet/passive/resistor/chip_resistor/esr.pdf, Composition="Thick Film", Failure Rate=-, Features="Automotive AEC-Q200, Pulse Withstanding", Height - Seated (Max)="0.022\" (0.55mm)", Packaging="Cut Tape (CT)", Part Status=Active, Pricing 1="1=0.15, 10=0.119, 25=0.0824, 50=0.0642, 100=0.0458, 250=0.03568, 500=0.02836, 1000=0.02012 (CAD)", RoHS="RoHS Compliant", Size / Dimension="0.063\" L x 0.031\" W (1.60mm x 0.80mm)", Stock 1=2440, Supplier 1=Digi-Key
R25: library part Res1, "RES SMD 20K OHM 5% 1/4W 0603", Manufacturer="Rohm Semiconductor", Manufacturer Part Number=ESR03EZPJ203, Operating Temperature="-55°C ~ 155°C", Package / Case="0603 (1608 Metric)", Power (Watts)="0.25W, 1/4W", Resistance (Ohms)=20k, Supplier Part Number 1=311-20.0KHRCT-ND, Temperature Coefficient=±200ppm/°C, Tolerance=±5%, Category=Resistors, ComponentLink1Description=http://rohmfs.rohm.com/en/products/databook/datasheet/passive/resistor/chip_resistor/esr.pdf, ComponentLink1URL=http://rohmfs.rohm.com/en/products/databook/datasheet/passive/resistor/chip_resistor/esr.pdf, Composition="Thick Film", Features="Automotive AEC-Q200, Pulse Withstanding", Height="0.022\" (0.55mm)", LatestRevisionDate=17-Jul-2002, LatestRevisionNote="Re-released for DXP Platform.", Number of Terminations=2, PackageDescription="Axial Device, Thru-Hole; 2 Leads; 0.3 in Pin Spacing", PackageReference=AXIAL-0.3, Packaging="Cut Tape (CT)", Pricing 1="1=0.15, 10=0.121, 25=0.0832, 100=0.0463, 250=0.03604, 500=0.02866, 1000=0.02033 (CAD)", Published=8-Jun-2000, Publisher="Altium Limited", RoHS="RoHS Compliant", Size / Dimension="0.063\" L x 0.031\" W (1.60mm x 0.80mm)", Stock 1=50602, Supplier 1=Digi-Key, Supplier Device Package="0603 (1608 Metric)"
R26 R30 R33 R34 R44 R46 R47: library part Res1, "RES SMD 20K OHM 5% 1/4W 0603", Manufacturer="Rohm Semiconductor", Manufacturer Part Number=ESR03EZPJ203, Operating Temperature="-55°C ~ 155°C", Package / Case="0603 (1608 Metric)", Power (Watts)="0.25W, 1/4W", Resistance (Ohms)=20k, Supplier Part Number 1=311-10KGRCT-ND, Temperature Coefficient=±200ppm/°C, Tolerance=±5%, Category=Resistors, ComponentLink1Description=http://rohmfs.rohm.com/en/products/databook/datasheet/passive/resistor/chip_resistor/esr.pdf, ComponentLink1URL=http://rohmfs.rohm.com/en/products/databook/datasheet/passive/resistor/chip_resistor/esr.pdf, Composition="Thick Film", Features="Automotive AEC-Q200, Pulse Withstanding", Height="0.022\" (0.55mm)", LatestRevisionDate=17-Jul-2002, LatestRevisionNote="Re-released for DXP Platform.", Number of Terminations=2, PackageDescription="Axial Device, Thru-Hole; 2 Leads; 0.3 in Pin Spacing", PackageReference=AXIAL-0.3, Packaging="Cut Tape (CT)", Pricing 1="1=0.15, 10=0.121, 25=0.0832, 100=0.0463, 250=0.03604, 500=0.02866, 1000=0.02033 (CAD)", Published=8-Jun-2000, Publisher="Altium Limited", RoHS="RoHS Compliant", Size / Dimension="0.063\" L x 0.031\" W (1.60mm x 0.80mm)", Stock 1=50602, Supplier 1=Digi-Key, Supplier Device Package="0603 (1608 Metric)"
R27: library part Res1, "RES SMD 0.0 OHM JUMPER 1/4W 0603", Manufacturer="Vishay Dale", Manufacturer Part Number=CRCW06030000Z0EAHP, Operating Temperature="-55°C ~ 155°C", Package / Case="0603 (1608 Metric)", Power (Watts)="0.25W, 1/4W", Resistance (Ohms)=0.0, Supplier Part Number 1=311-0.0GRCT-ND, Temperature Coefficient=-, Tolerance=Jumper, Category=Resistors, ComponentLink1Description=http://www.vishay.com/docs/20043/crcwhpe3.pdf, ComponentLink1URL=http://www.vishay.com/docs/20043/crcwhpe3.pdf, Composition="Thick Film", Features="Automotive AEC-Q200, Pulse Withstanding", Height="0.022\" (0.55mm)", LatestRevisionDate=17-Jul-2002, LatestRevisionNote="Re-released for DXP Platform.", Number of Terminations=2, PackageDescription="Axial Device, Thru-Hole; 2 Leads; 0.3 in Pin Spacing", PackageReference=AXIAL-0.3, Packaging="Cut Tape (CT)", Pricing 1="1=0.32, 10=0.272, 25=0.1972, 50=0.1432, 100=0.1062, 250=0.08152, 500=0.06422, 1000=0.04446, 2500=0.04075 (CAD)", Published=8-Jun-2000, Publisher="Altium Limited", RoHS="RoHS Compliant", Size / Dimension="0.063\" L x 0.033\" W (1.60mm x 0.85mm)", Stock 1=378250, Supplier 1=Digi-Key, Supplier Device Package="0603 (1608 Metric)"
R28 R35 R41: library part Res1, "RES SMD 20K OHM 5% 1/4W 0603", Manufacturer="Rohm Semiconductor", Manufacturer Part Number=ESR03EZPJ203, Operating Temperature="-55°C ~ 155°C", Package / Case="0603 (1608 Metric)", Power (Watts)="0.25W, 1/4W", Resistance (Ohms)=20k, Supplier Part Number 1=311-100HRDKR-ND, Temperature Coefficient=±200ppm/°C, Tolerance=±5%, Category=Resistors, ComponentLink1Description=http://rohmfs.rohm.com/en/products/databook/datasheet/passive/resistor/chip_resistor/esr.pdf, ComponentLink1URL=http://rohmfs.rohm.com/en/products/databook/datasheet/passive/resistor/chip_resistor/esr.pdf, Composition="Thick Film", Features="Automotive AEC-Q200, Pulse Withstanding", Height="0.022\" (0.55mm)", LatestRevisionDate=17-Jul-2002, LatestRevisionNote="Re-released for DXP Platform.", Number of Terminations=2, PackageDescription="Axial Device, Thru-Hole; 2 Leads; 0.3 in Pin Spacing", PackageReference=AXIAL-0.3, Packaging="Cut Tape (CT)", Pricing 1="1=0.15, 10=0.121, 25=0.0832, 100=0.0463, 250=0.03604, 500=0.02866, 1000=0.02033 (CAD)", Published=8-Jun-2000, Publisher="Altium Limited", RoHS="RoHS Compliant", Size / Dimension="0.063\" L x 0.031\" W (1.60mm x 0.80mm)", Stock 1=50602, Supplier 1=Digi-Key, Supplier Device Package="0603 (1608 Metric)"
R29 R32: "RES SMD 10K OHM 5% 1/4W 0603", Manufacturer="Rohm Semiconductor", Manufacturer Part Number=ESR03EZPJ103, Operating Temperature="-55°C ~ 155°C", Package / Case="0603 (1608 Metric)", Power (Watts)="0.25W, 1/4W", Resistance (Ohms)=10k, Supplier Device Package=0603, Supplier Part Number 1=311-10KGRCT-ND, Temperature Coefficient=±200ppm/°C, Tolerance=±5%, Category=Resistors, ComponentLink1Description=http://rohmfs.rohm.com/en/products/databook/datasheet/passive/resistor/chip_resistor/esr.pdf, ComponentLink1URL=http://rohmfs.rohm.com/en/products/databook/datasheet/passive/resistor/chip_resistor/esr.pdf, Composition="Thick Film", Failure Rate=-, Features="Automotive AEC-Q200, Pulse Withstanding", Height - Seated (Max)="0.022\" (0.55mm)", LatestRevisionDate=17-Jul-2002, LatestRevisionNote="Re-released for DXP Platform.", PackageDescription="Axial Device, Thru-Hole; 2 Leads; 0.3 in Pin Spacing", PackageReference=AXIAL-0.3, Packaging="Cut Tape (CT)", Part Status=Active, Pricing 1="1=0.15, 10=0.119, 25=0.0824, 50=0.0642, 100=0.0458, 250=0.03568, 500=0.02836, 1000=0.02012 (CAD)", Published=8-Jun-2000, Publisher="Altium Limited", RoHS="RoHS Compliant", Size / Dimension="0.063\" L x 0.031\" W (1.60mm x 0.80mm)", Stock 1=0, Supplier 1=Digi-Key
R31: library part CMP-1591-00001-1, "0603 (1608 Metric) Chip Resistor", Case-EIA=0603, Case-Metric=1608, Supplier Part Number 1=311-1.00MHRCT-ND, PackageReference=RESC0603(1608), Supplier 1=Digi-Key
R39: library part Res1, "RES SMD 6.8K OHM 5% 1/4W 0603", Manufacturer="Rohm Semiconductor", Manufacturer Part Number=ESR03EZPJ682, Operating Temperature="-55°C ~ 155°C", Package / Case="0603 (1608 Metric)", Power (Watts)="0.25W, 1/4W", Resistance (Ohms)=8k, Supplier Device Package=0603, Supplier Part Number 1=311-300KGRCT-ND, Temperature Coefficient=±200ppm/°C, Tolerance=±5%, Category=Resistors, ComponentLink1Description=http://rohmfs.rohm.com/en/products/databook/datasheet/passive/resistor/chip_resistor/esr.pdf, ComponentLink1URL=http://rohmfs.rohm.com/en/products/databook/datasheet/passive/resistor/chip_resistor/esr.pdf, Composition="Thick Film", Failure Rate=-, Features="Automotive AEC-Q200, Pulse Withstanding", Height - Seated (Max)="0.022\" (0.55mm)", Packaging="Cut Tape (CT)", Part Status=Active, Pricing 1="1=0.15, 10=0.119, 25=0.0824, 50=0.0642, 100=0.0458, 250=0.03568, 500=0.02836, 1000=0.02012 (CAD)", RoHS="RoHS Compliant", Size / Dimension="0.063\" L x 0.031\" W (1.60mm x 0.80mm)", Stock 1=2440, Supplier 1=Digi-Key
R42: library part Res1, "RES SMD 20K OHM 5% 1/4W 0603", Manufacturer="Rohm Semiconductor", Manufacturer Part Number=ESR03EZPJ203, Operating Temperature="-55°C ~ 155°C", Package / Case="0603 (1608 Metric)", Power (Watts)="0.25W, 1/4W", Resistance (Ohms)=20k, Supplier Part Number 1=311-1.00MHRCT-ND, Temperature Coefficient=±200ppm/°C, Tolerance=±5%, Category=Resistors, ComponentLink1Description=http://rohmfs.rohm.com/en/products/databook/datasheet/passive/resistor/chip_resistor/esr.pdf, ComponentLink1URL=http://rohmfs.rohm.com/en/products/databook/datasheet/passive/resistor/chip_resistor/esr.pdf, Composition="Thick Film", Features="Automotive AEC-Q200, Pulse Withstanding", Height="0.022\" (0.55mm)", LatestRevisionDate=17-Jul-2002, LatestRevisionNote="Re-released for DXP Platform.", Number of Terminations=2, PackageDescription="Axial Device, Thru-Hole; 2 Leads; 0.3 in Pin Spacing", PackageReference=AXIAL-0.3, Packaging="Cut Tape (CT)", Pricing 1="1=0.15, 10=0.121, 25=0.0832, 100=0.0463, 250=0.03604, 500=0.02866, 1000=0.02033 (CAD)", Published=8-Jun-2000, Publisher="Altium Limited", RoHS="RoHS Compliant", Size / Dimension="0.063\" L x 0.031\" W (1.60mm x 0.80mm)", Stock 1=50602, Supplier 1=Digi-Key, Supplier Device Package="0603 (1608 Metric)"
R43: library part Res1, "RES SMD 20K OHM 5% 1/4W 0603", Manufacturer="Rohm Semiconductor", Manufacturer Part Number=ESR03EZPJ203, Operating Temperature="-55°C ~ 155°C", Package / Case="0603 (1608 Metric)", Power (Watts)="0.25W, 1/4W", Resistance (Ohms)=20k, Supplier Part Number 1=YAG3633CT-ND, Temperature Coefficient=±200ppm/°C, Tolerance=±5%, Category=Resistors, ComponentLink1Description=http://rohmfs.rohm.com/en/products/databook/datasheet/passive/resistor/chip_resistor/esr.pdf, ComponentLink1URL=http://rohmfs.rohm.com/en/products/databook/datasheet/passive/resistor/chip_resistor/esr.pdf, Composition="Thick Film", Features="Automotive AEC-Q200, Pulse Withstanding", Height="0.022\" (0.55mm)", LatestRevisionDate=17-Jul-2002, LatestRevisionNote="Re-released for DXP Platform.", Number of Terminations=2, PackageDescription="Axial Device, Thru-Hole; 2 Leads; 0.3 in Pin Spacing", PackageReference=AXIAL-0.3, Packaging="Cut Tape (CT)", Pricing 1="1=0.15, 10=0.121, 25=0.0832, 100=0.0463, 250=0.03604, 500=0.02866, 1000=0.02033 (CAD)", Published=8-Jun-2000, Publisher="Altium Limited", RoHS="RoHS Compliant", Size / Dimension="0.063\" L x 0.031\" W (1.60mm x 0.80mm)", Stock 1=50602, Supplier 1=Digi-Key, Supplier Device Package="0603 (1608 Metric)"
R45 R49 R51 R52 R53 R54 R55 R56 R57 R58 R59 R60 R61 R62 R63 R64 R65 R66 R67 R68: library part CMP-1591-00001-1, "0603 (1608 Metric) Chip Resistor", Case-EIA=0603, Case-Metric=1608, Supplier Part Number 1=311-1.0KGRCT-ND, PackageReference=RESC0603(1608), Supplier 1=Digi-Key
R48: library part CMP-1591-00001-1, "0603 (1608 Metric) Chip Resistor", Case-EIA=0603, Case-Metric=1608, Supplier Part Number 1=311-10KGRCT-ND, PackageReference=RESC0603(1608), Supplier 1=Digi-Key
R50: library part CMP-1591-00001-1, "0603 (1608 Metric) Chip Resistor", Case-EIA=0603, Case-Metric=1608, Supplier Part Number 1=311-27KGRCT-ND, PackageReference=RESC0603(1608), Supplier 1=Digi-Key
TEST1: "Header, 2-Pin", Current Rating="3A per Contact", Insulation Color=Black, Manufacturer="Harwin Inc.", Manufacturer Part Number=M20-9990246, Material Flammability Rating="UL94 V-0", Operating Temperature="-40°C ~ 105°C", Supplier Part Number 1=S7000-ND, Voltage Rating=-, Applications=-, Category="Connectors, Interconnects", ComponentLink1Description=https://cdn.harwin.com/pdfs/M20-999.pdf, ComponentLink1URL=https://cdn.harwin.com/pdfs/M20-999.pdf, Connector Type="Header, Cuttable", Contact Finish - Mating=Tin, Contact Finish - Post=Tin, Contact Finish Thickness - Mating=-, Contact Finish Thickness - Post=-, Contact Length - Mating="0.240\" (6.10mm)", Contact Length - Post="0.118\" (3.00mm)", Contact Material=Brass, Contact Shape=Square, Contact Type="Male Pin", Fastening Type=Push-Pull, Features=-, Ingress Protection=-, Insulation Height="0.100\" (2.54mm)", Insulation Material="Polyamide (PA6T), Nylon 6T", LatestRevisionDate=17-Jul-2002, LatestRevisionNote="Re-released for DXP Platform.", Mated Stacking Heights="10.04mm, 10.64mm, 11.04mm, 16.54mm", Mounting Type="Through Hole", Number of Positions=2, Number of Positions Loaded=All, Number of Rows=1, Overall Contact Length="0.460\" (11.68mm)", Packaging=Bulk, Part Status=Active, Pitch - Mating="0.100\" (2.54mm)", Publisher="Altium Limited", RoHS="RoHS Compliant", Row Spacing - Mating=-, Shrouding=Unshrouded, Style="Board to Board or Cable", Supplier 1=Digi-Key, Supplier 2=Digi-Key, Supplier 3=Digi-Key, Supplier Part Number 2=A34268-40-ND, Supplier Part Number 3=A1921-ND, Termination=Solder
U1: library part CMP-1685-00007-1, "Precision Timer, 4.5 to 16 V, 0 to 70 degC, 8-Pin SOIC (D8), Green (RoHS & no Sb/Br), Tape and Reel", Case\Package=SMA, Forward Current="1 A", Forward Voltage="450 mV", Max Operating Temperature="125 degC", Max Surge Current="30 A", Min Operating Temperature="-55 degC", Package Quantity=1, Peak Reverse Current="500 uA", Supplier Part Number 1=296-6501-1-ND, Code_JEDEC=MS-012, ComponentLink1Description="Manufacturer URL", ComponentLink1URL=http://www.ti.com/, ComponentLink2Description=Datasheet, ComponentLink2URL=http://www.ti.com/general/docs/lit/getliterature.tsp?genericPartNumber=NE555&fileType=pdf, ComponentLink3Description="Package Specification", ComponentLink3URL=http://www.ti.com/lit/ml/msoi002j/msoi002j.pdf, DatasheetVersion="SLFS022I, 09/2014", Height="2.44 mm", Length="4.57 mm", Mount="Surface Mount", PackageDescription="8-Pin Small Outline Integrated Circuit, Body 4.9 x 3.9 mm, Pitch 1.27 mm", PackageReference=D0008A, PackageVersion="4040047-3/M, 06/2011", Packaging="Cut Tape", Pins=2, Radiation Hardening=No, REACH SVHC=Unknown, RoHSCompliant=true, Supplier 1=Digi-Key, Width="2.84 mm"
U2 U5: "IC Dual Comparator", Supplier Part Number 1=296-12848-1-ND, Supplier 1=Digi-Key
U3: library part "4-input OR Gate", Supplier Part Number 1=296-18587-2-ND, Supplier 1=Digi-Key
U4: Supplier Part Number 1=296-11601-1-ND, Supplier 1=Digi-Key
U6: library part CMP-1685-00007-1, "Precision Timer, 4.5 to 16 V, 0 to 70 degC, 8-Pin SOIC (D8), Green (RoHS & no Sb/Br), Tape and Reel", Case\Package=SMA, Forward Current="1 A", Forward Voltage="450 mV", Max Operating Temperature="125 degC", Max Surge Current="30 A", Min Operating Temperature="-55 degC", Package Quantity=1, Peak Reverse Current="500 uA", Supplier Part Number 1=296-6501-2-ND, Code_JEDEC=MS-012, ComponentLink1Description="Manufacturer URL", ComponentLink1URL=http://www.ti.com/, ComponentLink2Description=Datasheet, ComponentLink2URL=http://www.ti.com/general/docs/lit/getliterature.tsp?genericPartNumber=NE555&fileType=pdf, ComponentLink3Description="Package Specification", ComponentLink3URL=http://www.ti.com/lit/ml/msoi002j/msoi002j.pdf, DatasheetVersion="SLFS022I, 09/2014", Height="2.44 mm", Length="4.57 mm", Mount="Surface Mount", PackageDescription="8-Pin Small Outline Integrated Circuit, Body 4.9 x 3.9 mm, Pitch 1.27 mm", PackageReference=D0008A, PackageVersion="4040047-3/M, 06/2011", Packaging="Cut Tape", Pins=2, Radiation Hardening=No, REACH SVHC=Unknown, RoHSCompliant=true, Supplier 1=Digi-Key, Width="2.84 mm"
U7: library part CMP-0859-00053-3, "Single 2-Input Positive-AND Gate, DBV0005A, LARGE T&R", F @ Nom Voltage(Max)(Mhz)=150, Generic Part Number=SN74LVC1G08, ICC @ Nom Voltage(Max)(mA)=0.01, Manufacturer="Texas Instruments", Operating Temperature Range(C)="-40 to 125,-40 to 85", Rating=Catalog, tpd @ Nom Voltage(Max)(ns)=4.5,6,4,5, Voltage(Nom)(V)=1.8,2.5,3.3,5, 3-State Output=No, Bits(#)=1, DatasheetVersion=SCES217Y, Gate Type=AND, Input Type=CMOS/TTL, Logic=True, Output Drive (IOL/IOH)(Max)(mA)=32/-32, Output Type=CMOS, PackageReference=DBV0005A, Schmitt Trigger=No, Sub-Family="AND Gate", Technology Family=LVC, VCC(Max)(V)=5.5, VCC(Min)(V)=1.65
U8: library part CMP-0859-00188-4, "IC GATE OR 1CH 3-INP SOT23-6", Ambient Temperature Range High=+125°C, Ambient Temperature Range Low=-40°C, Manufacturer="TEXAS INSTRUMENTS", Max Supply Voltage=5.5V, Min Supply Voltage=1.5V, Nominal Supply Current=10-500uA, Package=DBV0006A, Temperature="-40°C to +125°C", Automotive=No, Category=IC, ComponentLink2Description=Datasheet, ComponentLink2URL=http://www.ti.com/lit/ds/symlink/sn74lvc1g332.pdf, Device Class L1="Integrated Circuits (ICs)", Device Class L2="Logic ICs", Device Class L3="Logic Gates", Digikey Description="IC GATE OR 1CH 3-INP SOT23-6", Height=1.45mm, Ipc Land Pattern Name=SOT95P280X145-6, Lead Free=Yes, Logic Function Desc=OR, Manufacturer Part Number=SN74LVC1G332DBVR, Mouser Description="Logic Gates Sngl 3 Inpt + OR Gt", Number Of Circuits=1, Number Of Inputs=3, Number of Outputs=1, Octopart=https://octopart.com/sn74lvc1g332dbvr-texas+instruments-464996, Propagation Delay=4.5ns, RoHS=TRUE, Standoff Height=0mm, Temperature Range High=+125°C, Temperature Range Low=-40°C
U9: library part CMP-1685-00009-2, "IC OPAMP GP 2 CIRCUIT 8SOIC", Case/Package=SOIC, Dual Supply Voltage=9V, Input Bias Current=250nA, Input Offset Voltage (Vos)=7mV, Max Dual Supply Voltage=16V, Max Operating Temperature=70°C, Max Supply Voltage=32V, Min Dual Supply Voltage=1.5V, Min Operating Temperature=0°C, Min Supply Voltage=3V, Nominal Supply Current=1.2mA, Operating Supply Current=1mA, Output Current=30mA, Package Quantity=2500, Power Supply Rejection Ratio (PSRR)=65dB, Voltage Gain=100dB, Bandwidth=700kHz, Common Mode Rejection Ratio=65dB, Contact Plating=Gold, Gain Bandwidth Product=700kHz, Height=1.58mm, Lead Free="Lead Free", Length=4.9mm, Mount="Surface Mount", Number of Amplifiers=2, Number of Channels=2, Number Of Circuits=2, Number of Elements=2, Number of Pins=8, Operating Supply Voltage=16V, Output Current per Channel=30mA, Packaging="Tape and Reel", Radiation Hardening=No, REACH SVHC="No SVHC", Slew Rate=0.3V/µs, Unity Gain Bandwidth Product=700kHz, Width=3.91mm

## Free pads (board coordinates)
  round 250 hole 137: 9(4775,2695) 9(4775,4815) 9(6640,2695)

## Via types
v1: diameter 31, hole 17, Top Layer to Bottom Layer, 236 vias
v2: diameter 55, hole 35, Top Layer to Bottom Layer, 3 vias
v3: diameter 25, hole 13, Top Layer to Bottom Layer, 2 vias
v4: diameter 40, hole 24, Top Layer to Bottom Layer, 1 vias
v5: diameter 36, hole 20, Top Layer to Bottom Layer, 1 vias

## Nets (pads, with @x,y where several pads share a name; then routed paths per layer and width w, separated by ;. In a path a pad name is that pad's centre, name@x,y a point inside that pad or via, vN(x,y) a via of type N, cw(c..) or ccw(c..) an arc to the next point about the centre after c; other vN are vias at no path point)
1IN-_BRAKE: R39.1 R43.2 U5.2 | length 237.3
  Top Layer w12: U5.2@5146.75,4662.32 5146.75,4738.33 5198.18,4789.76 R43.2@5211.75,4789.76 R39.1@5286.75,4789.76
1IN-_CURR: R23.1 R25.2 U2.2 | length 227.3
  Top Layer w12: R23.1@5211.75,4314.88 R25.2@5286.75,4314.88 5346.75,4374.88 U2.2@5346.75,4442.32
2IN+_BRAKE: R40.1 R44.2 U5.5 | length 212.8
  Top Layer w12: U5.5@5046.75,4442.32 5046.75,4339.88 5071.75,4314.88 R40.1@5136.75,4314.88 R40.1@5146.75,4314.88
2IN+_CURR: R24.1 R26.2 U2.5 | length 206.6